# Altium PCB PCB_RR-Updates-v1.0.PcbDoc (part 2 of 2)
Units mil, origin at the board's own origin, x right, y up, seen from the top; angles counter-clockwise.
Board outline 3045 x 2450 mil, 2 copper layers (Top Layer, Bottom Layer), stack 62.205 mil thick; 73 components, 57 nets, 209 pads, 80 vias.
Unrouted connection lines stored in the file: 2.
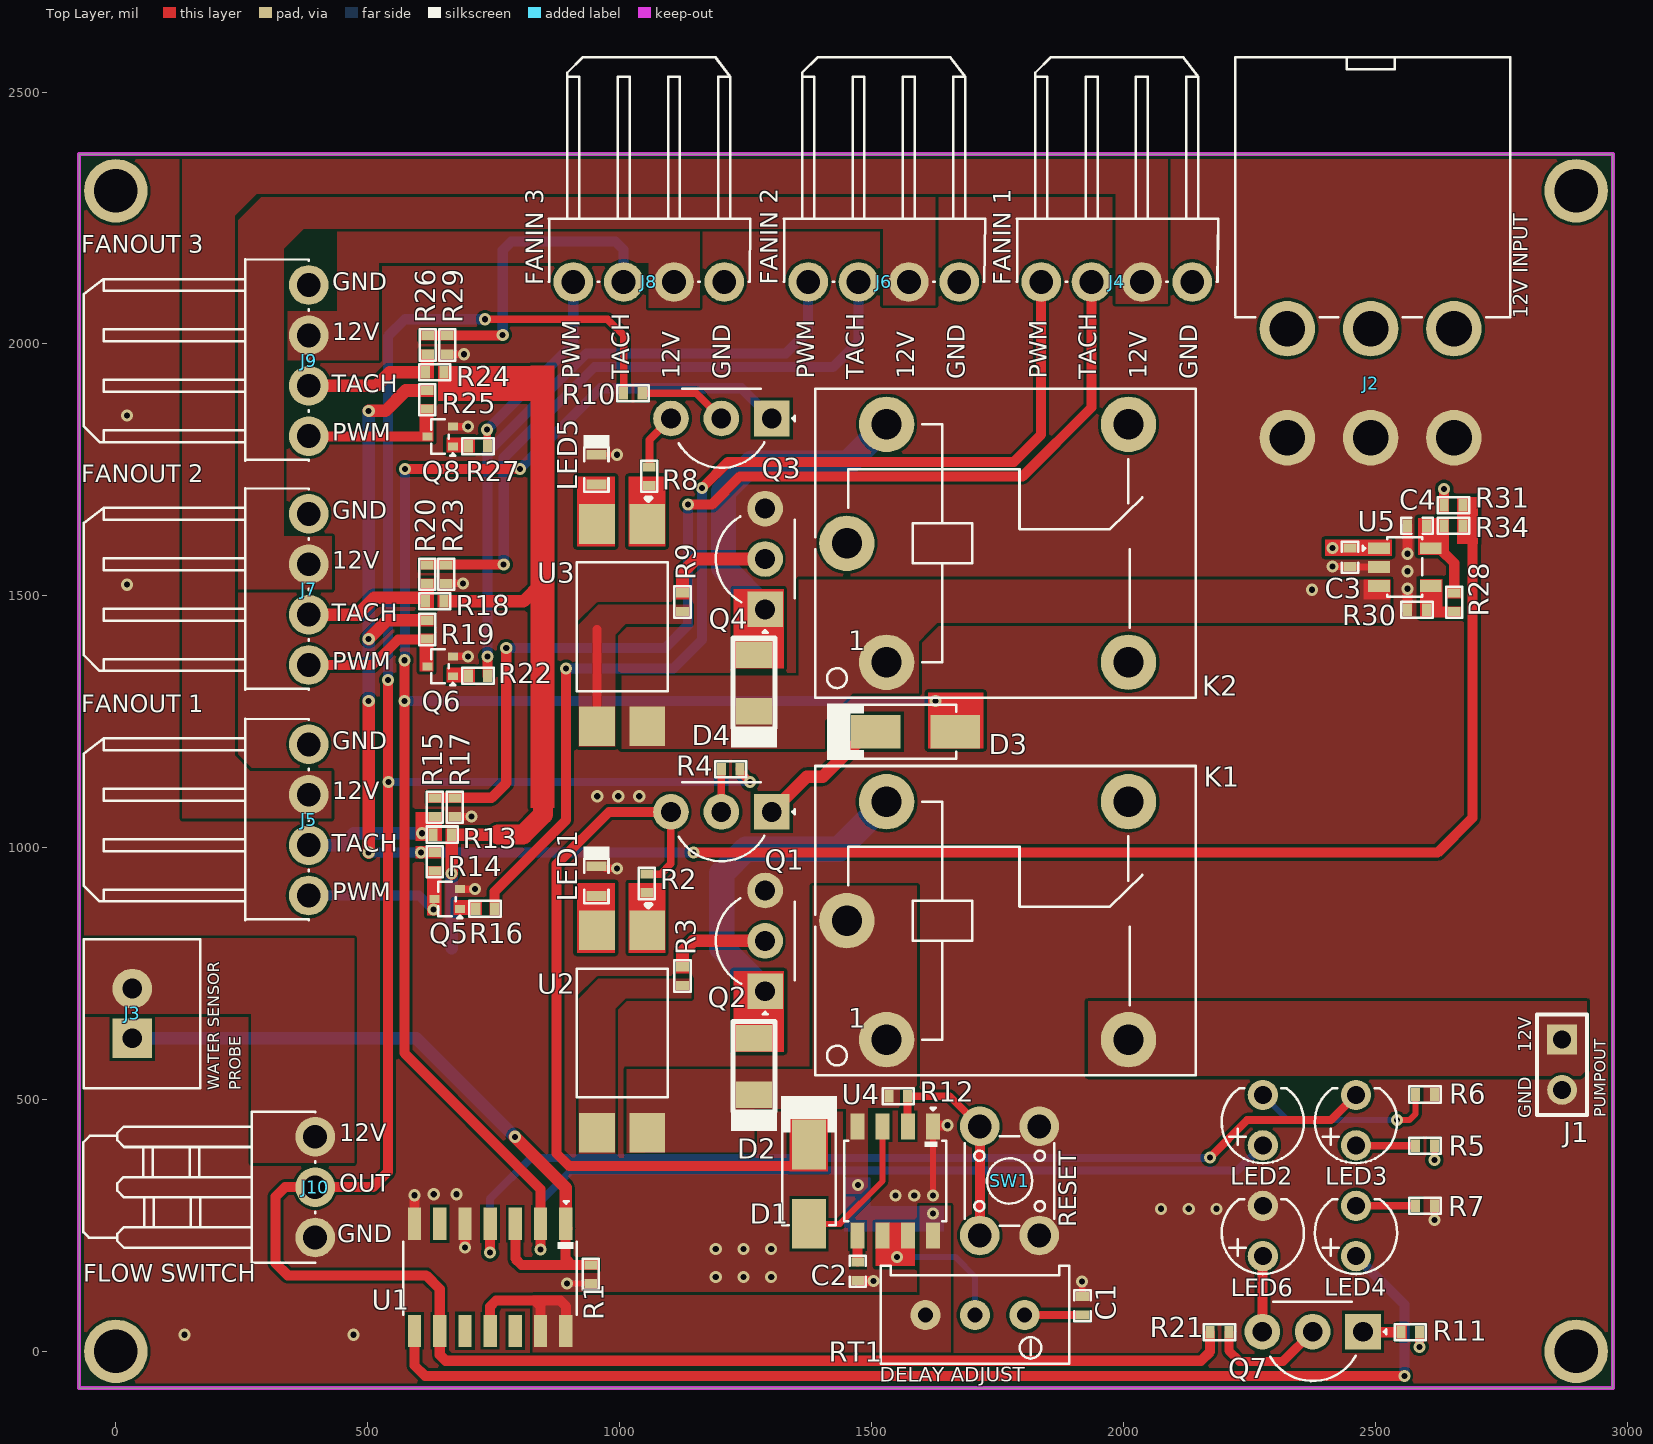
[diagram p0: Top Layer view]

## Via types
v1: diameter 24, hole 12, Top Layer to Bottom Layer, tented both sides, 46 vias
v2: diameter 24.02, hole 12.2, Top Layer to Bottom Layer, 22 vias
v3: diameter 24, hole 12, Top Layer to Bottom Layer, 12 vias

## Nets (pads, with @x,y where several pads share a name; then routed paths per layer and width w, separated by ;. In a path a pad name is that pad's centre, name@x,y a point inside that pad or via, vN(x,y) a via of type N, cw(c..) or ccw(c..) an arc to the next point about the centre after c; other vN are vias at no path point) (continued)
TACH2: (continued)
  Top Layer w20: R23.2@656,1562 v1(770,1562)
  Bottom Layer w20: v1(770,1562) 770,1774 950,1954 1424,1954 1474.36,2004.36 J6.3@1474.36,2120
TACH2_OUT: J7.3 R18.1 R20.2 | length 253
  Top Layer w20: R18.1@609.5,1496 618.5,1505
  Top Layer w25: J7.3 479.64,1462.64 513,1496 R18.1@609.5,1496
TACH3: J8.3 R26.1 R29.2 | length 595.7
  Top Layer w20: R29.2@658,2017 v1@768,2017
  Bottom Layer w20: v1(768,2018) 768,2186 785,2203 992,2203 1008,2187 J8.3
TACH3_OUT: J9.3 R24.1 R26.2 | length 253.2
  Top Layer w12: R24.1@614.5,1937 625,1937
  Top Layer w25: J9.3 517,1917 544,1944 R24.1
WATERSENSOR: D3.2 LED2.1 Q3.1 U1.2 | length 5181.4
  Top Layer w20: v1(573,1372) v1(573,1291) 573,592 843,322 U1.2 v1(843,202) ; v1(574,1752) v1(802.32,1752) ; 1627,1276 1627,1253.46 1650.46,1230 D3.2
  Bottom Layer w16: v1(843,202) 843,298 904,359 2227,359 LED2.1
  Bottom Layer w20: v1(573,1291) v1(1627,1291) ; v1@574,1373 573.77,1373.23 573.77,1375.59 574,1375.83 v1(574,1752) ; v1(802.32,1752) 962.32,1912 1242,1912 Q3.1
pads on no net: K1.3 K2.3 U1.6 U1.10 U1.12

## Polygon pours and split planes (outlines as drawn)
+12V on Top Layer "+12V_L01_P012" (solid, remove dead copper, pour order 12): 1407,1251.5 1462.5,1307 1594,1307 1594,1532 1356,1532 1356,1341 1004,1341 1004,1196 1407,1196
+12V on Top Layer "NONET_L-01_P-001" (solid, remove dead copper, pour order 21): 1573,1532 2530,1532 2530,1509 2530,1446 1631,1446 1573,1388
NetR3_1 on Top Layer "NONET_L-01_P-001" (solid, remove dead copper, pour order 20): 1142,739.5 958,739.5 919,700.5 919,392 991,392 991,462.5 991,680.5 1012,701.5 1142,701.5
NetR9_1 on Top Layer "NONET_L-01_P-001" (solid, remove dead copper, pour order 19): 1142,1482 958,1482 919,1443 919,1200 991,1200 991,1205 991,1423 1012,1444 1142,1444
NetJ1_1 on Top Layer "NONET_L-01_P-001" (solid, remove dead copper, pour order 18): 1934,695 2920,695 2920,559 2908,547 1930,547 1930,695
12VIN3 on Top Layer "NONET_L-01_P-001" (solid, remove dead copper, pour order 17): 522,1968 341,1968 341,2065 440,2065 440,2224 1159,2224 1159,2072 1058,2072 1058,2161 522,2161
12VIN2 on Top Layer "NONET_L-01_P-001" (solid, remove dead copper, pour order 16): 242,2245 288.51,2291.51 1627,2291.51 1627,2077 1523,2077 1523,2229 373,2229 333,2189 333,1618 429,1618 429,1513 242,1513
12VIN1 on Top Layer "NONET_L-01_P-001" (solid, remove dead copper, pour order 15): 2088,2080 2088,2372 132,2372 132,1058 428,1058 428,1152 267,1152 236,1183 236,2254 280,2298 1985,2298 1985,2080
GND on Top Layer "GND_L01_P007" (solid, remove dead copper, pour order 7): -73,-73 2972,-73 2972,2377 -73,2377
+12V on Top Layer "+12V_L01_P013" (solid, remove dead copper, pour order 13): -67,670 269,670 269,374 473,374 473,820 -67,820
+12V on Top Layer "+12V_L01_P010" (solid, pour order 10): 1014,560 1014,394 1051,394 1051,395 1267,395 1267,482 1450,482 1450,313 1493,313 1493,484 1590,484 1590,924 1383,924 1383,560
+12V on Top Layer "+12V_L01_P000" (solid, remove dead copper, pour order 0): 1657,289 1596,289 1596,111 828,111 828,-2 1657,-2
GNDOUTFAN on Bottom Layer "GNDOUTFAN_L02_P006" (solid, remove dead copper, pour order 6): 259,1711.5 259,2061 431,2061 431,2174 139,2174 139,1152.5 2077,1152.5 2077,1438 1946,1438 1946,1269 259,1269 259,1608.5 431,1608.5 431,1711.5
+12V on Bottom Layer "+12V_L02_P011" (solid, pour order 11): 2542,776 2665,653 2665,-9 2574,-9 2574,547 1611,547 1611,901 2220,901 2220,2100 2765,2100 2765,1681 2541,1681 2541,1609 2542,1609
+12V on Bottom Layer "+12V_L02_P014" (solid, remove dead copper, pour order 14): -63,674 769,674 769,547 1714,547 1714,666 1162,666 1162,822 -63,822 -63,675 -65,675
GNDINFAN on Bottom Layer "GNDINFAN_L02_P009" (solid, remove dead copper, pour order 9): 2207,1527 1413,1527 1386,1554 1386,1660 1418,1692 2074.54,1692 2089,1707.67 2089,2247 1728,2247 1728,2080 1625,2080 1625,2247 1262,2247 1262,2080 1156,2080 1156,2353 2207,2353
GND on Bottom Layer "GND_L02_P008" (solid, remove dead copper, pour order 8): -73,-73 2972,-73 2972,2377 -73,2377

## Keep-outs
Keep-Out Layer:
  lines w7.87: -73,-73 67,-73 2972,-73 2972,267 2972,2377 -73,2377 -73,-73

## Other copper
Top Layer:
  rectangle net NetD1_1: 1337,357 1414,462
  rectangle net NetD2_2: 1226,594 1326,755
  rectangle net NetQ2_2: 1112,750.5 1138,776
  rectangle net NetQ4_2: 1112,1493 1138,1511
  rectangle net +12V: 823,1079 871,1957
  rectangle net +12V: 2400,1579 2533,1612
  rectangle net +12V: 2477,1492.63 2530,1532
  region net +5V: 630.5,1920 600.5,1920 600.5,1895 630.5,1895
  region net +5V: 645.5,1003 595,1003 595,978 645.5,978
  region net +5V: 630.5,1464 600.5,1464 600.5,1439 630.5,1439
  rectangle net WATERSENSOR: 1612,1197 1722,1308
  region net PWM1: 761.5,865.75 761.5,899.25 741.5,899.25 741.5,865.75
  rectangle net NetR2_2: 1018,791.21 1091,930.21
  rectangle net NetLED1_1: 915,791.21 991,930.21
  rectangle net +12V: 2627,1664 2647,1691
  rectangle net NetD4_2: 1226,1356 1326,1513
  rectangle net NetR8_2: 1018,1598 1091,1737
  rectangle net NetLED5_1: 915,1598 991,1737
  rectangle net +5V: 2662,1603 2704,1696
  rectangle net NetR28_1: 2589,1457 2671,1479
  rectangle net NetR28_1: 2589,1457 2634,1533
  region net NetC4_2: 2671,1494.5 2671,1515.5 2643,1515.5 2643,1494.5
  rectangle net NetC4_2: 2585,1581 2647,1654
  rectangle net NetQ7_1: 2542,24 2563,52
  rectangle net +12V: 639.69,1887 863.69,1956.5
  rectangle net +12V: 639,1476.5 669,1501.5
  rectangle net +12V: 654,1013.5 821,1038.5
  rectangle net PWM3_OUT: 603,1806 631,1881
  rectangle net PWM1_OUT: 618,865 646,964
  rectangle net NetQ5_1: 670,866 727,896
  rectangle net PWM2_OUT: 603,1350 631,1425
  rectangle net NetQ6_1: 656,1328 713,1358
  rectangle net TACH1_OUT: 595,1013 647,1071
  rectangle net TACH1: 620,1089 686,1109
  rectangle net TACH2_OUT: 605,1476 632,1534
  rectangle net TACH2: 605,1552 671,1572
  rectangle net TACH3: 605,2007 671,2027
  rectangle net TACH3_OUT: 605,1931 632,1989
  rectangle net NetQ8_1: 656,1784 713,1814
  rectangle net NetJ3_1: 924,161.5 957,181.5
  rectangle net NetRT1_2: 1508,169 1586,256
Bottom Layer:
  rectangle net +12V: 1446,238 1498,345
  rectangle net +12V: 1446,238 1644,289

## Silkscreen, mask and mechanical layers (free items; w line width, h text height)
Top Overlay:
  text "FANOUT 3" at -69,2169.11 h60
  text "FANIN 2" at 1326,2117 h60 r90
  text "FANIN 3" at 859.99,2116 h60 r90
  text "FANIN 1" at 1788.28,2116.05 h60 r90
  text "GND" at 430,2095.11 h60
  text "12V INPUT" at 2812.89,2051 h50 r90
  text "12V" at 430,1995.72 h60
  text "PWM" at 932.58,1931.24 h60 r90
  text "12V" at 1131.79,1931.24 h60 r90
  text "PWM" at 1397.95,1931.24 h60 r90
  text "12V" at 1597.15,1931.24 h60 r90
  text "PWM" at 1859.58,1931.24 h60 r90
  text "12V" at 2058.79,1931.24 h60 r90
  text "GND" at 1231.45,1930.24 h60 r90
  text "GND" at 1696.81,1930.24 h60 r90
  text "GND" at 2158.45,1930.24 h60 r90
  text "TACH" at 1031.22,1929.43 h60 r90
  text "TACH" at 1496.59,1929.43 h60 r90
  text "TACH" at 1958.22,1929.43 h60 r90
  text "TACH" at 429,1892.14 h60
  text "PWM" at 430,1795.78 h60
  text "FANOUT 2" at -69,1713.75 h60
  text "GND" at 430,1640.75 h60
  text "12V" at 430,1541.36 h60
  text "TACH" at 429,1437.78 h60
  text "PWM" at 430,1341.42 h60
  text "FANOUT 1" at -69,1257.11 h60
  text "GND" at 430,1183.11 h60
  text "12V" at 430,1083.72 h60
  text "TACH" at 429,980.14 h60
  text "PWM" at 430,883.78 h60
  text "12V" at 2818.89,593.7 h45 r90
  text "WATER SENSOR" at 212.89,518.3 h40 r90
  text "PROBE" at 255.89,518.3 h40 r90
  text "PUMPOUT" at 2965.89,465.14 h40 r90
  text "GND" at 2818.89,463.26 h45 r90
  text "12V" at 443,405.11 h60
  text "OUT" at 443.26,305.11 h60
  text "RESET" at 1918.89,246.1 h60 r90
  text "GND" at 439.05,205.11 h60
  text "FLOW SWITCH" at -64.46,126.11 h60
  text "DELAY ADJUST" at 1516.5,-70.71 h50
Dimensions:
  lines w10: -73,2377 -73,2574 ; 2972,2377 2972,2574
Board_Outline:
  the board outline again, w10
Fabrication info:
  drawing of 191 lines, arcs and shapes, not listed
  text "Layer" at 3349.58,858 h60
  text "Name" at 3759.49,858 h60
  text "Material" at 4689.23,858 h60
  text "Thickness" at 5549,858 h60
  text "Constant" at 6198.84,858 h60
  text "Board Layer Stack" at 6768.7,858 h60
  text "Top Overlay" at 3759.49,738 h60
  text "Top Solder" at 3759.49,618 h60
  text "Solder Resist" at 4689.23,618 h60
  text "0.39mil" at 5549,618 h60
  text "3.3" at 6198.84,618 h60
  text "1" at 3349.58,498 h60
  text "Top Layer" at 3759.49,498 h60
  text "1.38mil" at 5549,498 h60
  text "Dielectric 1" at 3759.49,378 h60
  text "FR-4" at 4689.23,378 h60
  text "59.45mil" at 5549,378 h60
  text "4.5" at 6198.84,378 h60
  text "2" at 3349.58,258 h60
  text "Bottom Layer" at 3759.49,258 h60
  text "1.38mil" at 5549,258 h60
  text "Bottom Solder" at 3759.49,138 h60
  text "Solder Resist" at 4689.23,138 h60
  text "0.39mil" at 5549,138 h60
  text "3.3" at 6198.84,138 h60
  text "Bottom Overlay" at 3759.49,18 h60
  text "Total board thickness:" at 3349.58,-102 h60
  text "62.99mil" at 5549,-102 h60
Drill Drawing:
  circle w10: c3294.62,3071.83 r20
  circle w10: c3294.62,3071.83 r33.33
  circle w10: c3294.62,2321.83 r33.33
  lines w10: 3261.29,1605.17 3327.96,1605.17 3294.62,1538.5 3261.29,1605.17 ; 3261.29,1721.83 3294.62,1688.5 3327.96,1721.83 3294.62,1755.17 3261.29,1721.83 ; 3261.29,1905.17 3327.96,1905.17 3294.62,1838.5 3261.29,1905.17 ; 3261.29,1988.5 3294.62,2005.17 3327.96,1988.5 3311.29,2021.83 3327.96,2055.17 3294.62,2038.5 3261.29,2055.17 3277.96,2021.83 3261.29,1988.5 ; 3261.29,2138.5 3261.29,2155.17 3277.96,2171.83 3261.29,2188.5 3261.29,2205.17 3277.96,2205.17 3294.62,2188.5 3311.29,2205.17 3327.96,2205.17 3327.96,2188.5 3311.29,2171.83 3327.96,2155.17 3327.96,2138.5 3311.29,2138.5 3294.62,2155.17 3277.96,2138.5 3261.29,2138.5 ; 3261.29,2455.17 3277.96,2455.17 3294.62,2438.5 3311.29,2455.17 3327.96,2455.17 3311.29,2471.83 3327.96,2488.5 3311.29,2488.5 3294.62,2505.17 3277.96,2488.5 3261.29,2488.5 3277.96,2471.83 3261.29,2455.17 ; 3261.29,2588.5 3327.96,2588.5 3327.96,2655.17 3261.29,2655.17 3261.29,2588.5 ; 3261.29,2755.17 3277.96,2755.17 3277.96,2738.5 3311.29,2738.5 3311.29,2755.17 3327.96,2755.17 3327.96,2788.5 3311.29,2788.5 3311.29,2805.17 3277.96,2805.17 3277.96,2788.5 3261.29,2788.5 3261.29,2755.17 ; 3261.29,2888.5 3327.96,2888.5 3327.96,2955.17 3261.29,2955.17 3261.29,2888.5 ; 3274.62,1591.83 3314.62,1591.83 3294.62,1551.83 3274.62,1591.83 ; 3274.62,2901.83 3314.62,2901.83 3314.62,2941.83 3274.62,2941.83 3274.62,2901.83
  lines w15: 3201.5,1493.5 11041.33,1493.5 ; 3201.5,3143.5 11041.33,3143.5 ; 3752.38,1343.5 3752.38,3293.5 ; 4332.22,1343.5 4332.22,3293.5 ; 5431.9,1343.5 5431.9,3293.5 ; 5937.78,1343.5 5937.78,3293.5 ; 6671.58,1343.5 6671.58,3293.5 ; 8171.13,1343.5 8171.13,3293.5 ; 8760.98,1343.5 8760.98,3293.5 ; 9506.78,1343.5 9506.78,3293.5 ; 3201.5,1343.5 11041.33,1343.5 11041.33,3293.5 3201.5,3293.5 3201.5,1343.5
  text "Symbol" at 3291.5,3188.5 h72
  text "Count" at 3797.38,3188.5 h72
  text "Hole Size" at 4377.22,3188.5 h72
  text "Plated" at 5476.9,3188.5 h72
  text "Hole Type" at 5982.78,3188.5 h72
  text "Drill Layer Pair" at 6716.58,3188.5 h72
  text "Via/Pad" at 8216.13,3188.5 h72
  text "Pad Shape" at 8805.98,3188.5 h72
  text "Template" at 9551.78,3188.5 h72
  text "58" at 3797.38,3038.5 h60
  text "12.00mil (0.305mm)" at 4377.22,3038.5 h60
  text "PTH" at 5476.9,3038.5 h60
  text "Round" at 5982.78,3038.5 h60
  text "Top Layer - Bottom Layer" at 6716.58,3038.5 h60
  text "Via" at 8216.13,3038.5 h60
  text "Rounded" at 8805.98,3038.5 h60
  text "(Mixed)" at 9551.78,3038.5 h60
  text "22" at 3797.38,2888.5 h60
  text "12.20mil (0.310mm)" at 4377.22,2888.5 h60
  text "PTH" at 5476.9,2888.5 h60
  text "Round" at 5982.78,2888.5 h60
  text "Top Layer - Bottom Layer" at 6716.58,2888.5 h60
  text "Via" at 8216.13,2888.5 h60
  text "Rounded" at 8805.98,2888.5 h60
  text "v61h31m-2479mx-2479" at 9551.78,2888.5 h60
  text "3" at 3797.38,2738.5 h60
  text "30.00mil (0.762mm)" at 4377.22,2738.5 h60
  text "PTH" at 5476.9,2738.5 h60
  text "Round" at 5982.78,2738.5 h60
  text "Top Layer - Bottom Layer" at 6716.58,2738.5 h60
  text "Pad" at 8216.13,2738.5 h60
  text "Rounded" at 8805.98,2738.5 h60
  text "c152h76m157mx157p152" at 9551.78,2738.5 h60
  text "2" at 3797.38,2588.5 h60
  text "35.43mil (0.900mm)" at 4377.22,2588.5 h60
  text "PTH" at 5476.9,2588.5 h60
  text "Round" at 5982.78,2588.5 h60
  text "Top Layer - Bottom Layer" at 6716.58,2588.5 h60
  text "Pad" at 8216.13,2588.5 h60
  text "(Mixed)" at 8805.98,2588.5 h60
  text "(Mixed)" at 9551.78,2588.5 h60
  text "8" at 3797.38,2438.5 h60
  text "35.43mil (0.900mm)" at 4377.22,2438.5 h60
  text "PTH" at 5476.9,2438.5 h60
  text "Round" at 5982.78,2438.5 h60
  text "Top Layer - Bottom Layer" at 6716.58,2438.5 h60
  text "Pad" at 8216.13,2438.5 h60
  text "Rounded" at 8805.98,2438.5 h60
  text "c152h90o0_0m157mx157p152" at 9551.78,2438.5 h60
  text "17" at 3797.38,2288.5 h60
  text "39.37mil (1.000mm)" at 4377.22,2288.5 h60
  text "PTH" at 5476.9,2288.5 h60
  text "Round" at 5982.78,2288.5 h60
  text "Top Layer - Bottom Layer" at 6716.58,2288.5 h60
  text "Pad" at 8216.13,2288.5 h60
  text "(Mixed)" at 8805.98,2288.5 h60
  text "(Mixed)" at 9551.78,2288.5 h60
  text "4" at 3797.38,2138.5 h60
  text "47.24mil (1.200mm)" at 4377.22,2138.5 h60
  text "PTH" at 5476.9,2138.5 h60
  text "Round" at 5982.78,2138.5 h60
  text "Top Layer - Bottom Layer" at 6716.58,2138.5 h60
  text "Pad" at 8216.13,2138.5 h60
  text "Rounded" at 8805.98,2138.5 h60
  text "c200h120m205mx205p200(1)" at 9551.78,2138.5 h60
  text "27" at 3797.38,1988.5 h60
  text "47.24mil (1.200mm)" at 4377.22,1988.5 h60
  text "PTH" at 5476.9,1988.5 h60
  text "Round" at 5982.78,1988.5 h60
  text "Top Layer - Bottom Layer" at 6716.58,1988.5 h60
  text "Pad" at 8216.13,1988.5 h60
  text "Rounded" at 8805.98,1988.5 h60
  text "(Mixed)" at 9551.78,1988.5 h60
  text "10" at 3797.38,1838.5 h60
  text "60.00mil (1.524mm)" at 4377.22,1838.5 h60
  text "PTH" at 5476.9,1838.5 h60
  text "Round" at 5982.78,1838.5 h60
  text "Top Layer - Bottom Layer" at 6716.58,1838.5 h60
  text "Pad" at 8216.13,1838.5 h60
  text "Rounded" at 8805.98,1838.5 h60
  text "(Mixed)" at 9551.78,1838.5 h60
  text "6" at 3797.38,1688.5 h60
  text "70.87mil (1.800mm)" at 4377.22,1688.5 h60
  text "PTH" at 5476.9,1688.5 h60
  text "Round" at 5982.78,1688.5 h60
  text "Top Layer - Bottom Layer" at 6716.58,1688.5 h60
  text "Pad" at 8216.13,1688.5 h60
  text "Rounded" at 8805.98,1688.5 h60
  text "(Mixed)" at 9551.78,1688.5 h60
  text "4" at 3797.38,1538.5 h60
  text "86.61mil (2.200mm)" at 4377.22,1538.5 h60
  text "PTH" at 5476.9,1538.5 h60
  text "Round" at 5982.78,1538.5 h60
  text "Top Layer - Bottom Layer" at 6716.58,1538.5 h60
  text "Pad" at 8216.13,1538.5 h60
  text "Rounded" at 8805.98,1538.5 h60
  text "c320h220" at 9551.78,1538.5 h60
  text "161 Total" at 3797.38,1388.5 h60

## Dimensions
-73,2377 to -73,-73 on Dimensions
-73,2377 to 2972,2377 on Dimensions

## Text inside footprints (layer, text, board x,y; h text height)
K1: Top Overlay "1" at 1453.66,642.87 h39.37
K2: Top Overlay "1" at 1453.66,1392.09 h39.37